# Altium PCB jlink.PcbDoc
Units mil, origin at the board's own origin, x right, y up, seen from the top; angles counter-clockwise.
Board outline 2620 x 1025 mil, 2 copper layers (Top Layer, Bottom Layer); 30 components, 28 nets, 122 pads, 66 vias.
Unrouted connection lines stored in the file: 1.
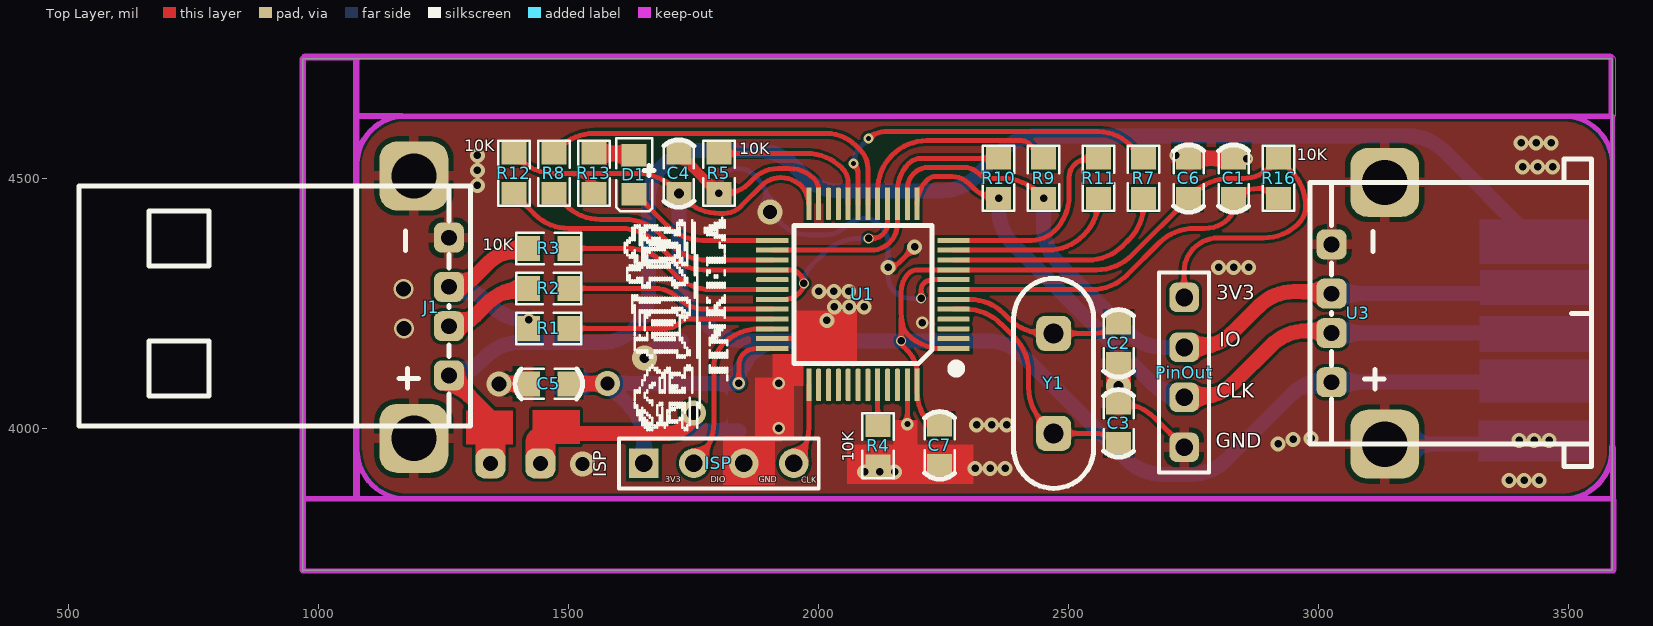
[diagram p0: Top Layer view]
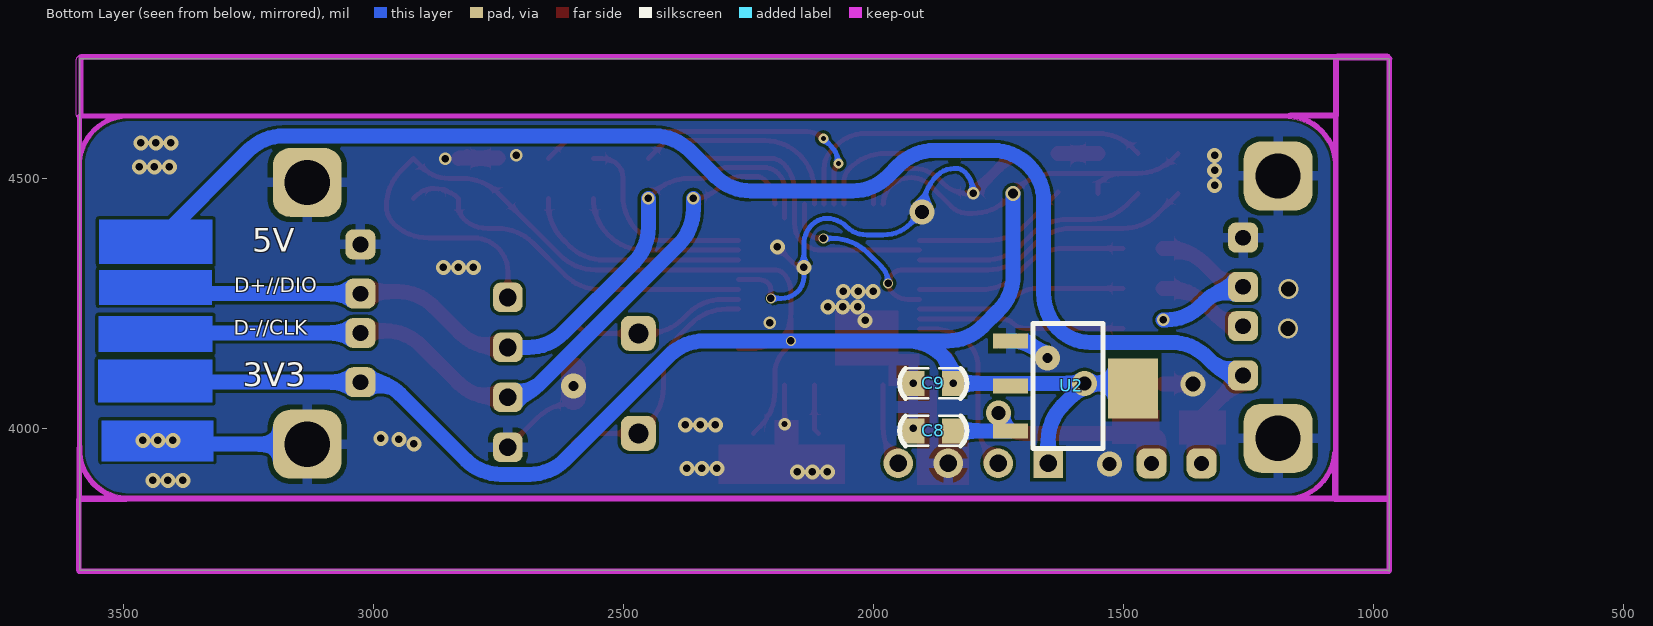
[diagram p1: Bottom Layer view, seen from below]

## Layer stack, top to bottom
Top Solder: solder mask 0.4, Solder Resist, Dk 3.5
Top Layer: signal copper 1.4
Dielectric1: dielectric 12.6, FR-4, Dk 4.8
Bottom Layer: signal copper 1.4
Bottom Solder: solder mask 0.4, Solder Resist, Dk 3.5

## Board outline
969,3716 969,4741 3589,4741 3589,3717 970,3717
cut-out: 3589,4534 ccw(c3490.5,4527.5) 3484,4626 3589,4626
cut-out: 966.45,3712.45 965.45,3713.45 965.47,3713.44 cw(c969,3717) 963.99,3717 963.99,3860 cw(c969,3860) 969,3865.01 3589,3865.01 cw(c3589,3860) 3592.56,3863.53 3592.55,3863.55 3593.55,3862.55 3593.53,3862.56 cw(c3590,3859) 3595.01,3859 3595.01,3717 cw(c3590,3717) 3593.53,3713.44 3593.55,3713.45 3592.55,3712.45 3592.56,3712.47 cw(c3589,3716) 3589,3710.99 970,3710.99 cw(c970,3716)
cut-out: 966.45,3712.45 965.45,3713.45 965.47,3713.44 cw(c969,3717) 963.99,3717 963.99,4741 cw(c969,4741) 965.47,4744.56 965.45,4744.55 968.45,4747.55 968.44,4747.53 cw(c972,4744) 972,4749.02 1074,4749.02 cw(c1074,4744) 1077.56,4747.53 1077.55,4747.55 1079.55,4745.55 1079.53,4745.56 cw(c1076,4742) 1081.02,4742 1081.02,3860 cw(c1076,3860) 1070.98,3860 1070.98,4738.98 974.08,4738.98 974.01,4738.92 974.01,3719.01 cw(c970,3716) 975.01,3716 cw(c970,3716)
cut-out: 965.47,3713.44 cw(c969,3717) 963.99,3717 963.99,4741 cw(c969,4741) 965.47,4744.56 965.45,4744.55 968.45,4747.55 968.44,4747.53 cw(c972,4744) 972,4749.02 1074,4749.02 cw(c1074,4744) 1077.56,4747.53 1077.55,4747.55 1079.55,4745.55 1079.53,4745.56 cw(c1076,4742) 1081.02,4742 1081.02,3860 cw(c1076,3860) 1076,3854.99 974.01,3854.99 974.01,3719.01 cw(c970,3716) 975.01,3716 cw(c970,3716) 966.45,3712.45
cut-out: 972.55,4737.45 974.08,4738.98 1070.98,4738.98 1070.98,4626 ccw(c1076,4626) 1076,4620.98 3589,4620.98 ccw(c3589,4626) 3592.56,4622.47 3592.55,4622.45 3593.55,4623.45 3593.53,4623.44 ccw(c3590,4627) 3595.01,4627 3595.01,4740 ccw(c3590,4740) 3593.53,4743.56 3593.55,4743.55 3589.55,4747.55 3589.56,4747.53 ccw(c3586,4744) 3586,4749.02 972,4749.02 ccw(c972,4744) 968.44,4747.53 968.45,4747.55 965.45,4744.55 ccw(c969,4741)
cut-out: 3589,4534 ccw(c3490.5,4527.5) 3484,4626 3589,4626
cut-out: 3497,3854.99 cw(c3497,3860) 3496.67,3865 ccw(c3490.5,3958.5) 3583.98,3952.17 3583.98,3965 cw(c3589,3965) 3589,3970.01 cw(c3589,3965) 3594,3965.33 cw(c3490.5,3958.5) 3594.23,3958.5 cw(c3490.5,3958.5) 3594.01,3951.84 3594.01,3862.01 cw(c3590,3859) 3595.01,3859 cw(c3590,3859) 3586.99,3854.99
cut-out: 1183,3860 cw(c1176.5,3958.5) 1078,3952 1078,3860
cut-out: 1070.98,4534.16 1070.98,4738.98 974.08,4738.98 972.55,4737.45 cw(c969,4741) 965.45,4744.55 968.45,4747.55 968.44,4747.53 cw(c972,4744) 972,4749.02 1074,4749.02 cw(c1074,4744) 1077.56,4747.53 1077.55,4747.55 1079.55,4745.55 1079.53,4745.56 cw(c1076,4742) 1081.02,4742 1081.02,4631.02 1168,4631.02 cw(c1168,4626) 1173.02,4626 cw(c1168,4626) 1168.33,4621 ccw(c1174.5,4527.5) 1081.02,4533.83 1081.02,4521 cw(c1076,4521) 1071,4520.67 cw(c1174.5,4527.5)

## Design rules (kind name [scope] priority, off if disabled: settings)
Clearance [All] p1: gap=6 ignorepadtopadclearanceinfootprint=FALSE except(0: Arc-Hole Track-Hole SMDPad-Hole THPad-Hole Via-Hole Fill-Hole Poly-Hole Region-Hole Text-Hole)
HoleSize [All] p1: absolutevalues=TRUE maxlimit=100 minlimit=12 maxpercent=80.000 minpercent=20.000
HoleToHoleClearance [All] p1: gap=5 allowstackedmicrovias=TRUE
MinimumSolderMaskSliver [All] p1: minsoldermaskwidth=0
PolygonConnect PolygonConnect_1 [isVia] p1: connectstyle=Direct reliefconductorwidth=10 reliefentries=4 polygonreliefangle="90 Angle" airgapwidth=10
PolygonConnect [All] p2: connectstyle=Relief reliefconductorwidth=20 reliefentries=4 polygonreliefangle="90 Angle" airgapwidth=10
RoutingVias [All] p1: holewidth=15 width=25 viastyle="Through Hole" minholewidth=15 minwidth=20 maxholewidth=200 maxwidth=50
SilkToSilkClearance [All] p1: silktosilkclearance=0
SilkToSolderMaskClearance [IsPad] p1: minsilkscreentomaskgap=0 clearancetoexposedcopper=TRUE
SolderMaskExpansion [All] p1: expansion=4
Width [All] p1: maxlimit=100 minlimit=6 preferedwidth=10
25 further rules are at their usual default settings.

## Classes and differential pairs
component class jlink: C1 C2 C3 C4 C5 C6 C7 D1 ISP J1 PinOut R1 R2 R3 R4 R5 R7 R8 R9 R10 R11 R12 R13 R16 U1 U2 Y1

## Components (designator, comment, footprint, x,y, rotation, side; value= is the part's Value field where it differs from the comment)
C1 "104" 0805_cap 2831,4501 r90 top
C2 "22pF" 0805_cap 2601,4171 r270 top
C3 "22pF" 0805_cap 2601,4011 r90 top
C4 "104" 0805_cap 1721,4511 r90 top
C5 "104" 0805_cap 1461,4090 r180 top
C6 "104" 0805_cap 2741,4501 r90 top
C7 "104" 0805_cap 2243,3967 r270 top
C8 "104" 0805_cap 1881,3996 r0 bottom
C9 "104" 0805_cap 1881,4091 r0 bottom
D1 "" LED-0805 1631,4507 r270 top
ISP "" HDR1X4#1 1651,3931 r0 top
J1 "" USB_A公头 1011,4251 r0 top
PinOut "" HDR1X4#2 2732,4263 r270 top
R1 "100" 0805 1461,4201 r0 top
R2 "100" 0805 1461,4281 r0 top
R3 "10K" 0805 1461,4361 r180 top
R4 "10K" 0805 2120,3966 r270 top
R5 "10K" 0805 1801,4511 r270 top
R7 "100" 0805 2651,4501 r270 top
R8 "100" 0805 1471,4511 r270 top
R9 "100" 0805 2451,4501 r90 top
R10 "100" 0805 2361,4501 r90 top
R11 "100" 0805 2561,4501 r270 top
R12 "10K" 0805 1391,4511 r90 top
R13 "100" 0805 1551,4511 r270 top
R16 "10K" 0805 2921,4501 r90 top
U1 "f103c8" LQFP48S 2271,4161 r180 top
U2 "" "AMS1117 3V3 SOT23" 1541,4211 r270 bottom
U3 "" USB_A1ĸ 3192,4250 r180 top
Y1 "" XTAL-8M 2471,4091 r90 top

## Footprints (in the part's own frame and the unit in brackets; to place one, negate y for a bottom-side part, rotate by r counter-clockwise, add the part's x,y. Pads: shape width x height; smd on the part's side, far side on the other; paste and mask are expansions set on the pad)
0805 [mil]
  rect 45x50 smd: 1(-40,0) 2(40,0)
  silkscreen extent -65,-31 65,31, body extent -50,-20 50,20, height 25
0805_cap [mil]
  rect 45x50 smd: 1(-40,0) 2(40,0)
  silkscreen extent -67,-30 67,30, body extent -50,-20 50,20, height 25
"AMS1117 3V3 SOT23" [mil]
  rect 30x70 smd: 1(35,-185) 2(125,-185) 3(215,-185)
  rect 120x100 smd: 2(130,60)
  silkscreen extent 0,-140 250,0, body extent 20,-160 230,20, height 35
HDR1X4#1 [mm] "Connector; Header; 4 Position"
  rect 1.5x1.5 hole 0.9: 1(0,0)
  round 1.5 hole 0.9: 2(2.54,0) 3(5.08,0) 4(7.62,0)
  silkscreen extent -1.27,-1.27 8.89,1.27
HDR1X4#2 [mm] "Connector; Header; 4 Position"
  rrect50% 1.5x1.5 hole 0.9: 1(0,0) 2(2.54,0) 3(5.08,0) 4(7.62,0)
  silkscreen extent -1.27,-1.27 8.89,1.27
LED-0805 [mil]
  rect 45x50 smd: 1(-40,0) 2(37.5,0)
  silkscreen extent -75,-35 72,40, body extent -40,-20 40,20, height 30
LQFP48S [mil] "DPIN-0.5"
  rect 65x10 smd: 1(0.42,0.29) 5(0.42,-78.45) 6(0.42,-98.13) 7(0.42,-117.82) 8(0.42,-137.5) 9(0.42,-157.19) 10(0.42,-176.87) 11(0.42,-196.56) 12(0.42,-216.24) 25(362.63,-216.24) 26(362.63,-196.56) 27(362.63,-176.87) 28(362.63,-157.19) 30(362.63,-117.82) 31(362.63,-98.13) 32(362.63,-78.45) 33(362.63,-58.76) 34(362.63,-39.08) 35(362.63,-19.39) 36(362.63,0.29)
  rrect50% 65x10 smd: 2(0.42,-19.39) 3(0.42,-39.08) 4(0.42,-58.76) 29(362.63,-137.5)
  rect 10x65 smd: 13(73.26,-289.08) 14(92.94,-289.08) 15(112.63,-289.08) 16(132.31,-289.08) 17(152,-289.08) 18(171.68,-289.08) 19(191.37,-289.08) 20(211.05,-289.08) 23(270.11,-289.08) 24(289.79,-289.08) 37(289.79,73.13) 44(152,73.13) 47(92.94,73.13) 48(73.26,73.13)
  rrect50% 10x65 smd: 21(230.74,-289.08) 22(250.42,-289.08) 38(270.11,73.13) 39(250.42,73.13) 40(230.74,73.13) 41(211.05,73.13) 42(191.37,73.13) 43(171.68,73.13) 45(132.31,73.13) 46(112.63,73.13)
  silkscreen extent -10,-246 319,46, body extent 1,-289 366,71, height 30
USB_A1ĸ [mil]
  rrect50% 60x60 hole 31.5: 1(165,156.59) 2(165,58.16) 3(165,-20.58) 4(165,-119)
  rrect50% 137.8x137.8 hole 90.55: 5(58.7,280.61) 5(58.7,-243.02)
  silkscreen extent -355,-290 208,325, body extent -349,-292 208,330, height 297
USB_A公头 [mil] "USB_A公头"
  rrect50% 60x60 hole 31.5: 1(250,-144) 2(250,-45.58) 3(250,33.16) 4(250,131.59)
  rrect50% 137.8x137.8 hole 90.55: 5(180,-270) 5(180,255)
  silkscreen extent -490,-245 293,235
XTAL-8M [mil]
  rrect50% 70x70 hole 40: 1(-100,0) 2(100,0)
  silkscreen extent -210,-80 210,80, body extent -210,-80 210,80, height 110

## Part data
C1 C2 C3 C4 C5 C6 C7 C8 C9: library part Cap, "Capacitor"
D1: library part LED2, "Typical RED, GREEN, YELLOW, AMBER GaAs LED"
ISP PinOut: library part "Header 4", "Header, 4-Pin"
J1: library part USB, "USB-A"
R1 R2 R3 R4 R5 R7 R8 R9 R10 R11 R12 R13 R16: library part Res2, "Resistor"
U1: library part STM32F103C8T6, "STM32 ARM-based 32-bit MCU with 64 Kbytes Flash, 48-pin LQFP, Industrial Temperature"
U2: library part "AMS1117 3V3"
U3: library part USB_ĸ, "USB_ĸ"
Y1: library part XTAL, "Crystal Oscillator"

## Free pads (board coordinates)
  rrect60% 60x60 hole 30: 2(1344,3931) 3(1444,3931)

## Via types
v1: diameter 30, hole 15, Top Layer to Bottom Layer, 39 vias
v2: diameter 25, hole 15, Top Layer to Bottom Layer, 10 vias
v3: diameter 20, hole 15, Top Layer to Bottom Layer, 4 vias
v4: diameter 50, hole 28, Top Layer to Bottom Layer, 4 vias
v5: diameter 40, hole 30, Top Layer to Bottom Layer, 2 vias
v6: diameter 20, hole 10, Top Layer to Bottom Layer, 2 vias
v7: diameter 50, hole 20, Top Layer to Bottom Layer, 2 vias
v8: diameter 30, hole 20, Top Layer to Bottom Layer, 1 vias
v9: diameter 25, hole 12, Top Layer to Bottom Layer, 1 vias
v10: diameter 50, hole 30, Top Layer to Bottom Layer, 1 vias

## Nets (pads, with @x,y where several pads share a name; then routed paths per layer and width w, separated by ;. In a path a pad name is that pad's centre, name@x,y a point inside that pad or via, vN(x,y) a via of type N, cw(c..) or ccw(c..) an arc to the next point about the centre after c; other vN are vias at no path point)
3V3: C4.1 C5.1 C6.1 C7.1 C9.1 ISP.1 PinOut.1 R12.2 R13.2 R16.2 U1.1 U1.9 U1.24 U1.36 U1.48 U2.2 U3.1 | length 5507.4
  Top Layer w10: R12.2 1401.71,4540.29 ccw(c1472.42,4611) 1472.42,4511 1502.72,4511 ; R13.2 1551,4491 ccw(c1502.72,4442.72) 1502.72,4511 ; v8(1721,4471) 1710.29,4481.71 ccw(c1639.58,4411) 1639.58,4511 1502.72,4511 ; C4.1@1731.71,4460.29 ccw(c1802.42,4531) 1802.42,4431 1811,4431 ccw(c1811,4479.28) 1845.14,4445.14 1887.49,4487.49 cw(c1924.56,4450.42) 1924.56,4502.84 cw(c1924.56,4443.44) 1966.56,4485.44 cw(c1931.19,4450.08) U1.24 ; v2(1841,4091) 1841,4126.86 cw(c1875.14,4126.86) 1851,4151 cw(c1874.44,4127.56) 1874.44,4160.71 U1.36 ; C7.1@2241,3991 2227.03,4004.97 cw(c2297.74,4075.68) 2197.74,4075.68 U1.48 2197.74,4111 ccw(c2134.35,4111) 2179.17,4155.83 2170.95,4164.05 cw(c2182.9,4176) v3(2166,4176) 2166,4221 ccw(c2211.87,4221) 2171.7,4198.86 ; U1.1 2246.69,4160.71 cw(c2246.69,4255.82) 2179.43,4188.56 cw(c2211.87,4221) 2171.7,4198.86 ; PinOut.1 2732,4315.13 cw(c2796.87,4315.13) 2736.27,4338.27 cw(c2796.87,4315.13) 2751,4361 2751.49,4361.49 cw(c2801,4311.99) 2774.99,4376.99 cw(c2801,4311.99) 2801,4382 2890.99,4382 ccw(c2890.99,4481.01) 2961,4411 ccw(c2927.2,4444.8) 2975,4444.8 2975,4445.58 ccw(c2875,4445.58) 2945.71,4516.29 R16.2 2902.21,4522.21 cw(c2851,4573.43) 2851,4501 2822.42,4501 ccw(c2822.42,4401) 2751.71,4471.71 C6.1 2627.48,4347.48 cw(c2556.77,4418.19) 2556.77,4318.19 U1.9 2198.36,4318.19 ccw(c2198.36,4293.64) 2181,4311 ccw(c2217.21,4274.79) 2166,4274.79 2166,4232.13 ccw(c2266,4232.13) 2171.7,4198.86
  Top Layer w30: C5.1 1575.59,4090 ccw(c1575.59,4093.41) v4(1578,4091)
  Bottom Layer w20: v2(1841,4091) C9.1@1841,4094.3
  Bottom Layer w30: U2.2@1481,4081 cw(c1505.14,4056.86) 1505.14,4091 v4(1578,4091) ; ISP.1 1651,3976.58 ccw(c1551,3976.58) 1621.71,4047.29 v4(1578,4091) ; v8(1721,4471) 1721,4307.42 ccw(c1821,4307.42) 1750.29,4236.71 1781.71,4205.29 ccw(c1852.42,4276) 1852.42,4176 1933.42,4176 ; v2(1841,4091) v4(1578,4091) ; C9.1@1841,4094.3 cw(c1915.12,4094.3) 1862.71,4146.71 cw(c1933.42,4076) 1933.42,4176 ; U3.1 3389.17,4093.41 ; U3.1@3027,4097.41 3016.83,4097.41 ccw(c3016.83,3997.41) 2946.12,4068.12 2816.45,3938.45 cw(c2745.74,4009.16) 2745.74,3909.16 2688.26,3909.16 cw(c2688.26,4009.16) 2617.55,3938.45 2409.29,4146.71 ccw(c2338.58,4076) 2338.58,4176 v3(2166,4176) 1933.42,4176
GND: C1.2 C2.2 C3.2 C4.2 C5.2 C6.2 C7.2 C8.2 C9.2 ISP.3 J1.4 J1.5 PinOut.4 R4.2 R5.2 U1.8 U1.23 U1.35 U1.47 U2.1 U3.4 U3.5 | length 2801.4
  Top Layer w10: v2(1801,4471) 1812.72,4471 ccw(c1812.72,4539.28) 1861,4491 1871,4501 cw(c1919.28,4452.72) 1919.28,4521 1942.72,4521 cw(c1942.72,4452.72) 1991,4501 cw(c1967.12,4477.12) 2000.89,4477.12 U1.23 ; ISP.3 1891.71,3971.71 ccw(c1821,4042.42) 1921,4042.42 ; U1.35 1938.97,4180.39 ccw(c1938.97,4280.39) 1978.05,4188.34 ccw(c1938.97,4280.39) 2009.68,4209.68 v1(2017,4217) 1977.26,4177.26 ccw(c2016.53,4138) 1961,4138 1961,4119.28 cw(c1941,4119.28) 1955.14,4105.14 cw(c1921,4139.28) v2(1921,4091) 1921,4042.42 ; v2(1921,4001) 1921,4042.42 ; R4.2@2121,3911 2148.77,3938.77 ccw(c2078.06,4009.48) v9(2178.06,4009.48) ; v1(2140,4323) ccw(c2140,4351.97) 2160.49,4331.49 v1(2193,4364) ; U1.47 v9(2178.06,4009.48) ; v3(2206,4261) 2206,4278.93 cw(c2223.07,4278.93) 2211,4291 cw(c2229.12,4272.88) 2228.5,4298.5 cw(c2229.12,4272.88) 2229.12,4298.5 U1.8 ; C7.2@2241,3911 2215.14,3911 cw(c2215.14,3945.14) 2191,3921 cw(c2222.25,3952.25) 2178.06,3952.25 v9(2178.06,4009.48) ; C3.2@2602.58,4051 cw(c2602.58,3951) 2673.29,4021.71 PinOut.4 ; C6.2 C6.2@2752,4542 ; 2780,4541 ccw(c2780,4587.95) 2787.2,4541.55 ccw(c2780,4587.95) 2813.2,4554.75 cw(c2768.57,4478.57) C1.2
  Top Layer w20: C4.2 v2(1801,4471)
  Top Layer w30: v10(1361,4090) C5.2 ; C6.2@2752,4542 2787.2,4541.55 C1.2
  Top Layer w50: C3.2@2601,4063 v7(2601,4086) C2.2@2601,4119
  Bottom Layer w10: v2(1801,4471) 1801,4472.96 cw(c1859.04,4472.96) 1818,4514 cw(c1834.9,4497.1) 1834.9,4521 1839.2,4521 cw(c1839.2,4473.2) 1873,4507 1873.71,4506.29 cw(c1803,4435.58) 1903,4435.58 v4(1903,4434) 1926.37,4410.63 ccw(c1981,4465.25) 1981,4388 2013.96,4388 ccw(c2013.96,4446.04) 2055,4405 cw(c2093.63,4366.37) 2093.63,4421 cw(c2093.63,4379.06) 2123.28,4408.72 cw(c2082.93,4368.36) 2140,4368.36 v1(2140,4323) 2140,4304.1 ccw(c2181.49,4304.1) 2152.15,4274.76 ccw(c2185.38,4307.98) 2185.38,4261 v3(2206,4261)
  Bottom Layer w30: v7(1652,4142) 1657.72,4147.72 cw(c1726,4079.43) U2.1 ; U3.5@3133.3,3969.39 3369.64,3969.39 ccw(c3369.64,3995.36) v1@3388,3977
  other v1: 3382,3897 3412,3897 3442,3897 2093,3914 2123,3914 2153,3914 2314,3921 2344,3921 2374,3921 2920,3970 3402,3977 3432,3977 3462,3977 2950,3979 2986,3981 2317,4008 2347,4008 2377,4008 2032,4244 2062,4244 2092,4244 2001,4275 2031,4275 2061,4275 2801,4323 2831,4323 2861,4323 1318,4487 1318,4517 3409,4524 3439,4524 3469,4524 1318,4547 3406,4572 3436,4572 3466,4572
  other v2: 2208,4212 2857,4540 2715,4547
  other v4: 1528,3930
  other v5: 1171,4201 1170,4280
JTCK/CLK: ISP.4 U1.37 | length 165.1
  Top Layer w10: ISP.4 1951.92,3931.92 ccw(c1881.21,4002.63) 1981.21,4002.63 U1.37
JTMS/IO: ISP.2 U1.34 | length 362.8
  Top Layer w10: ISP.2 1761.71,3941.71 ccw(c1691,4012.42) 1791,4012.42 1791,4123.01 cw(c1858.57,4123.01) 1810.79,4170.79 cw(c1881.5,4100.08) 1881.5,4200.08 U1.34
LED: D1.2 U1.25 | length 312.9
  Top Layer w10: D1.2@1631,4473.5 1697.97,4406.53 ccw(c1768.68,4477.24) 1768.68,4377.24 U1.25
NetD1_1: D1.1 R13.1 | length 80
  Top Layer w30: R13.1 D1.1@1631,4551
NetJ1_2: J1.2 R2.1 | length 183.7
  Top Layer w30: J1.2 ccw(c1261,4281.29) 1314.65,4227.65 1338.71,4251.71 cw(c1409.42,4181) 1409.42,4281 R2.1
NetJ1_3: J1.3 R1.1 R3.2 | length 363.1
  Top Layer w30: J1.3 ccw(c1261,4359.63) 1314.34,4306.25 1339.81,4331.71 cw(c1410.52,4261) 1410.52,4361 R3.2
  Bottom Layer w10: J1.3 J1.3@1266.41,4284.16
  Bottom Layer w30: J1.3@1266.41,4284.16 cw(c1266.41,4184.16) 1337.12,4254.88 1344.71,4247.29 ccw(c1415.42,4318) 1415.42,4218 v2(1421,4218)
NetR4_1: R4.1 U1.44 | length 100.2
  Top Layer w10: R4.1@2111,3991 2119,3999 U1.44
NetR5_1: R5.1 U1.20 | length 329.5
  Top Layer w10: R5.1 1961,4551 1977.05,4551 cw(c1977.05,4451) 2047.76,4521.71 cw(c2018.35,4492.3) 2059.95,4492.3 2059.95,4473.06 U1.20
NRST: C1.1 R16.1 U1.7 | length 741.8
  Top Layer w10: U1.7 2547.4,4278.82 ccw(c2547.4,4378.82) 2618.11,4308.11 2681.71,4371.71 cw(c2752.42,4301) 2752.42,4401 2772.72,4401 ccw(c2772.72,4469.28) 2821,4421 ccw(c2796.86,4445.14) 2831,4445.14 C1.1 cw(c2879.28,4412.72) 2879.28,4481 cw(c2879.28,4428.57) 2916.36,4465.64 R16.1
OSC_IN: C3.1 U1.5 Y1.1 | length 492.4
  Top Layer w10: U1.5 2294.87,4239.45 cw(c2294.87,4139.45) 2365.58,4210.16 2391.71,4184.03 cw(c2321,4113.32) 2421,4113.32 2421,4082.42 ccw(c2521,4082.42) 2450.29,4011.71 Y1.1 2552.72,3991 cw(c2552.72,3922.72) C3.1
OSC_OUT: C2.1 U1.6 Y1.2 | length 355.6
  Top Layer w10: U1.6 2303.08,4259.13 cw(c2303.08,4163.08) 2371,4231 2381.71,4220.29 ccw(c2452.42,4291) 2452.42,4191 Y1.2 2552.72,4191 ccw(c2552.72,4259.28) C2.1
TCKIN>CLK: PinOut.3 R10.1 U1.13 U3.2 | length 1501.4
  Top Layer w10: U1.13 cw(c2264.52,4450.08) 2217.3,4497.3 cw(c2235.89,4478.71) 2235.89,4505 2267.2,4505 cw(c2267.2,4457.2) 2301,4491 2309.79,4482.21 ccw(c2361,4533.43) v2(2361,4461) R10.1@2350.08,4450.08
  Top Layer w30: PinOut.3 2760.58,4063 ccw(c2760.58,4163) 2831.29,4092.29 2905.55,4166.55 cw(c2976.26,4095.84) 2976.26,4195.84 U3.2@3027,4195.84
  Bottom Layer w30: v2(2361,4461) 2361,4439.42 ccw(c2461,4439.42) 2390.29,4368.71 2670.54,4088.46 ccw(c2732,4149.91) PinOut.3 ; U3.2 3379.91,4191.84 cw(c3379.91,4171.91) 3394,4186
TCKOUT: R10.2 U1.15 U1.26 | length 589.6
  Top Layer w10: U1.26 2105.82,4357.56 ccw(c2105.82,4410.04) 2142.88,4372.88 ccw(c2105.82,4410.04) 2142.93,4372.93 ccw(c2105.66,4410.2) 2158.37,4410.2 U1.15 2158.37,4476.37 cw(c2235.63,4476.37) 2160.08,4492.53 cw(c2235.63,4476.37) 2181,4531 cw(c2205.14,4506.86) 2205.14,4541 R10.2
TDIIN: R8.1 U1.18 | length 747.5
  Top Layer w10: R8.1 1482.72,4562.72 cw(c1551,4494.43) 1551,4591 2016.84,4591 cw(c2016.84,4508.52) 2075.16,4566.84 2083.98,4558.02 cw(c2046.96,4521) 2099.32,4521 U1.18
TDIOUT: R8.2 U1.27 | length 479.6
  Top Layer w10: R8.2 1493.71,4448.29 ccw(c1564.42,4519) 1564.42,4419 1612.78,4419 cw(c1612.78,4319) 1683.49,4389.71 1706.04,4367.16 ccw(c1776.75,4437.87) 1776.75,4337.87 U1.27
TDOIN: R12.1 U1.16 U1.28 U1.31 | length 990.8
  Top Layer w10: R12.1 1432.72,4429.28 ccw(c1501,4497.57) 1501,4401 1605.33,4401 cw(c1605.33,4301) 1676.04,4371.71 1700.27,4347.48 ccw(c1770.98,4418.19) 1770.98,4318.19 U1.28 1939.5,4318.19 cw(c1939.5,4259.5) 1951.08,4317.04 cw(c1943.64,4293.64) 1961,4311 1963.93,4308.07 cw(c1946.86,4291) v3(1971,4291) cw(c1946.86,4291) 1963.93,4273.93 1961,4271 cw(c1932.35,4299.65) 1932.35,4259.13 U1.31 ; v3(2101,4381) 2108.49,4381 ccw(c2108.49,4411.19) 2129.83,4389.83 ccw(c2108.46,4411.2) 2138.69,4411.2 U1.16
  Bottom Layer w10: v3(1971,4291) cw(c2019.28,4291) 1985.14,4325.14 2011.71,4351.71 cw(c2082.42,4281) 2082.42,4381 v3(2101,4381)
TMSIN>IO: PinOut.2 R9.1 U1.14 U3.3 | length 1512.3
  Top Layer w10: U1.14@2178.06,4422.25 U1.14 2178.06,4479.75 cw(c2222.25,4479.75) 2191,4511 cw(c2219.97,4482.03) 2219.97,4523 2292.03,4523 cw(c2292.03,4482.03) 2321,4511 ccw(c2345.14,4535.14) 2345.14,4501 2369.58,4501 cw(c2369.58,4401) 2440.29,4471.71 v2(2451,4461)
  Top Layer w30: PinOut.2 2757.58,4163 ccw(c2757.58,4263) 2828.29,4192.29 2881.29,4245.29 cw(c2952,4174.58) 2952,4274.58 U3.3@3027,4274.58
  Bottom Layer w30: v2(2451,4461) 2451,4403.16 ccw(c2551,4403.16) 2480.29,4332.45 2620.45,4192.29 ccw(c2691.16,4263) 2691.16,4163 PinOut.2 ; U3.3 3367.32,4270.58 ccw(c3367.32,4285.68) 3378,4275
TMSOUT: R9.2 U1.17 | length 430.2
  Top Layer w10: U1.17 2119,4478.34 cw(c2217.16,4478.34) 2147.75,4547.75 ; 2147.78,4547.78 cw(c2217.16,4478.34) 2217.16,4576.5 2407.72,4576.5 cw(c2407.72,4557.72) 2421,4571 R9.2
TRESIN: R11.1 U1.12 | length 402.1
  Top Layer w10: U1.12 2426.72,4377.24 ccw(c2426.72,4442.81) 2473.08,4396.45 ccw(c2403.26,4466.27) 2502,4466.27 2502,4503.86 cw(c2536.14,4503.86) 2512,4528 cw(c2543.38,4496.62) 2543.38,4541 R11.1
TRESOUT: R11.2 U1.11 | length 349.9
  Top Layer w10: U1.11 2459.14,4357.56 ccw(c2459.14,4457.56) 2529.85,4386.85 2531.71,4388.71 ccw(c2461,4459.42) 2561,4459.42 R11.2
TRSTIN: R7.1 U1.19 | length 715.6
  Top Layer w10: v6(2071,4531) cw(c2050.16,4510.16) 2079.63,4510.16 U1.19 ; v6(2101,4581) cw(c2133.59,4548.41) 2133.59,4594.5 2561,4594.5 cw(c2561,4506.38) 2623.31,4568.69 R7.1
  Bottom Layer w10: v6(2071,4531) cw(c2119.28,4531) 2085.14,4565.14 v6(2101,4581)
TRSTOUT: R7.2 U1.10 | length 453.9
  Top Layer w10: U1.10 2539.45,4337.87 ccw(c2539.45,4437.87) 2610.16,4367.16 2621.71,4378.71 ccw(c2551,4449.42) 2651,4449.42 R7.2
USBD+: R1.2 U1.33 | length 412.4
  Top Layer w10: R1.2 1696.86,4201 ccw(c1696.86,4235.14) 1721,4211 cw(c1742.16,4189.84) 1742.16,4219.76 U1.33
USBD-: R2.2 U1.32 | length 418.5
  Top Layer w10: R2.2 1672.72,4281 cw(c1672.72,4212.72) 1721,4261 ccw(c1773.03,4313.03) 1773.03,4239.45 U1.32
USBD_EN: R3.1 U1.30 | length 432.8
  Top Layer w10: R3.1 1619.58,4361 cw(c1619.58,4261) 1690.29,4331.71 1713.89,4308.11 ccw(c1784.6,4378.82) 1784.6,4278.82 U1.30
V5.0: C8.1 J1.1 pad.2 pad.3 U2.3 | length 3365.6
  Top Layer w10: 1343,3994 cw(c1340.59,3991.59) 1344,3991.59 ; 1444,3974.1 cw(c1467.9,3974.1) 1451,3991
  Top Layer w25: v4@1750,4020 v4(1750,4032)
  Top Layer w30: J1.1 1347.71,4020.29 ; 1451,3991 1698,3991 ccw(c1698,4046.53) 1737.26,4007.26 v4@1750,4020
  Top Layer w60: pad.2 1344,3991.59 ; pad.3 1444,3974.1
  Bottom Layer w30: J1.1 ccw(c1261,4193.91) 1322.46,4132.46 1333.71,4143.71 cw(c1404.42,4073) 1404.42,4173 1566.23,4173 ccw(c1566.23,4264.2) 1630.67,4199.67 ccw(c1566.23,4264.2) 1630.71,4199.71 ccw(c1560,4270.42) 1660,4270.42 1660,4455.58 cw(c1760,4455.58) 1689.29,4526.29 1690.71,4527.71 cw(c1761.42,4457) 1761.42,4557 1878.58,4557 cw(c1878.58,4457) 1949.29,4527.71 1971.71,4505.29 ccw(c2042.42,4576) 2042.42,4476 2246.03,4476 ccw(c2246.03,4576) 2316.74,4505.29 2368.16,4556.71 cw(c2438.87,4486) 2438.87,4586 3180.58,4586 cw(c3180.58,4486) 3251.29,4556.71 3426.98,4381.02 ; v4(1750,4032) cw(c1721.03,4032) 1741.51,4011.51 U2.3 C8.1 ; 2317.29,4505.29 2320.71,4508.71 ; 3456,4369 3460,4365
pads on no net: U1.2 U1.3 U1.4 U1.21 U1.22 U1.29 U1.38 U1.39 U1.40 U1.41 U1.42 U1.43 U1.45 U1.46

## Polygon pours and split planes (outlines as drawn)
GND on Top Layer "GND_L01_P012" (solid, pour order 12): 3590,3859 cw(c3597.95,3863.71) 3589,3866 3588,4626 1076,4626 1078,3866 3579.34,3864 cw(c3579.34,3850.35) 3589,3860
GND on Bottom Layer "GND_L02_P014" (solid, pour order 14): 1078,3860 cw(c1082.83,3864.83) 1076,3864.83 1076,4626 3576.89,4626 cw(c3576.89,4608.88) 3589,4620.98 cw(c3577.25,4609.73) 3593.52,4609.37 3593.52,3855.15 1089.7,3855.15 cw(c1089.7,3871.7)

## Keep-outs
Keep-Out Layer:
  lines w10: 969,3717 969,4741 ; 969,3717 970,3716 3589,3716 3590,3717 3590,3859 3589,3860 ; 969,3717 969,3860 ; 969,3860 3589,3860 ; 969,3860 969,4741 ; 969,3860 1076,3860 ; 969,4741 972,4744 ; 969,4741 972,4744 ; 972,4744 3586,4744 ; 972,4744 1074,4744 ; 1074,4744 1076,4742 ; 1074,4744 3586,4744 ; 1074,4744 1076,4742 ; 1076,3860 3589,3860 ; 1076,3860 1076,4626 ; 1076,3860 1076,4742 ; 1076,4626 3589,4626 ; 1076,4626 1076,4742 ; 1076,4626 1168,4626 ccw(c1174.5,4527.5) 1076,4521 1076,4626 ; 3586,4744 3586,4626 3484,4626 cw(c3490.5,4527.5) 3589,4534 3589,4626 ; 3589,3860 3589,4626 ; 3589,3860 3589,4626 ; 3589,3860 3589,3965 cw(c3490.5,3958.5) 3497,3860 3589,3860 ; 1078,3860 1183,3860 cw(c1176.5,3958.5) 1078,3952 1078,3860

## Other copper
Top Layer:
  rectangle net GND: 2151,3955 2199,4017.57
  rectangle net GND: 2058,3890 2311,3969
  rectangle net GND: 1809,3888 1913,3986
  rectangle net GND: 1873,3975 1927,4103
  rectangle net GND: 1936,4085.79 1970.11,4133
  rectangle net GND: 1908.37,3983 1951,4149.61
  rectangle net GND: 1950,4126.45 2077.13,4237
  rectangle net V5.0: 1295,3969 1389,4037
  rectangle net V5.0: 1428,3970 1523,4038
Bottom Layer:
  rectangle net TMSIN>IO: 3324,4248 3550,4318
  rectangle net TCKIN>CLK: 3323,4154 3551,4226
  rectangle net V5.0: 3323,4330 3550,4419
  rectangle net 3V3: 3323,4053 3552,4139
  rectangle net GND: 3321,3935 3545,4017

## Silkscreen, mask and mechanical layers (free items; w line width, h text height)
Top Overlay:
  drawing of 379 lines, arcs and shapes, not listed
  text "3V3" at 2796,4248 h50
  text "IO" at 2802,4154 h50
  text "CLK" at 2796,4052 h50
  text "GND" at 2795,3952 h50
  text "ISP" at 1585,3903 h44 r90
  text "3V3" at 1694,3889 h20
  text "DIO" at 1785,3889 h20
  text "GND" at 1881,3889 h20
  text "CLK" at 1966,3888 h20
Bottom Overlay:
  text "5V" at 3243,4338 h80
  text "D+//DIO" at 3279,4263 h50
  text "D-//CLK" at 3280,4178 h50
  text "3V3" at 3262,4069 h80
Top Solder:
  rectangle: 1299,3971 1386,4033
  rectangle: 1431,3972 1507,4033
  text "ゆさ、サイコ" at 3434,4004 h100 r90
Bottom Solder:
  drawing of 3133 lines, arcs and shapes, not listed
  text "Ailike" at 3072,3879 h100